# Altium PCB EVT24_REWORK_R167.PcbDoc (part 1 of 2)
Units mil, origin at the board's own origin, x right, y up, seen from the top; angles counter-clockwise.
Board outline 3543.31 x 2755.91 mil, 4 copper layers (Top Layer, Mid-Layer 1, Mid-Layer 2, Bottom Layer), stack 65.748 mil thick; 105 components, 66 nets, 607 pads, 256 vias.
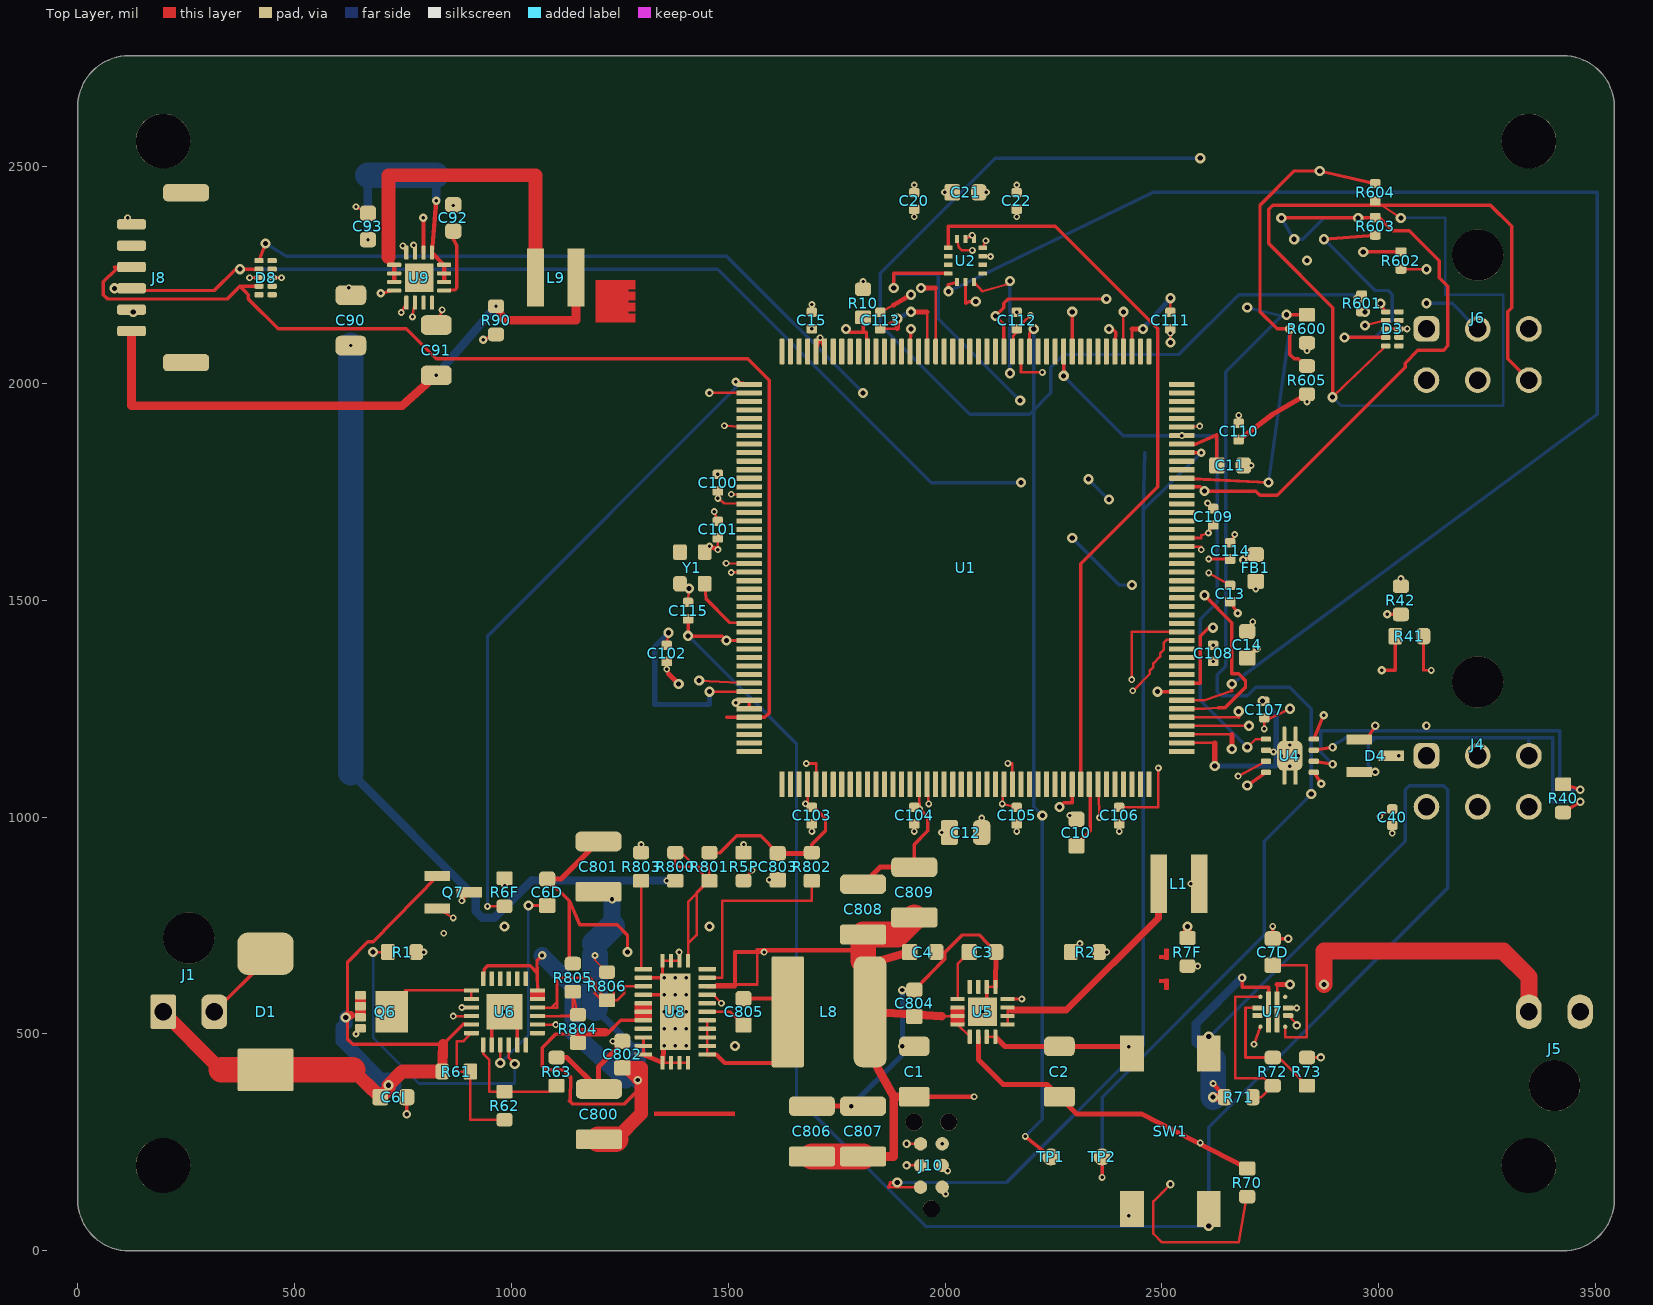
[diagram p0: Top Layer view]
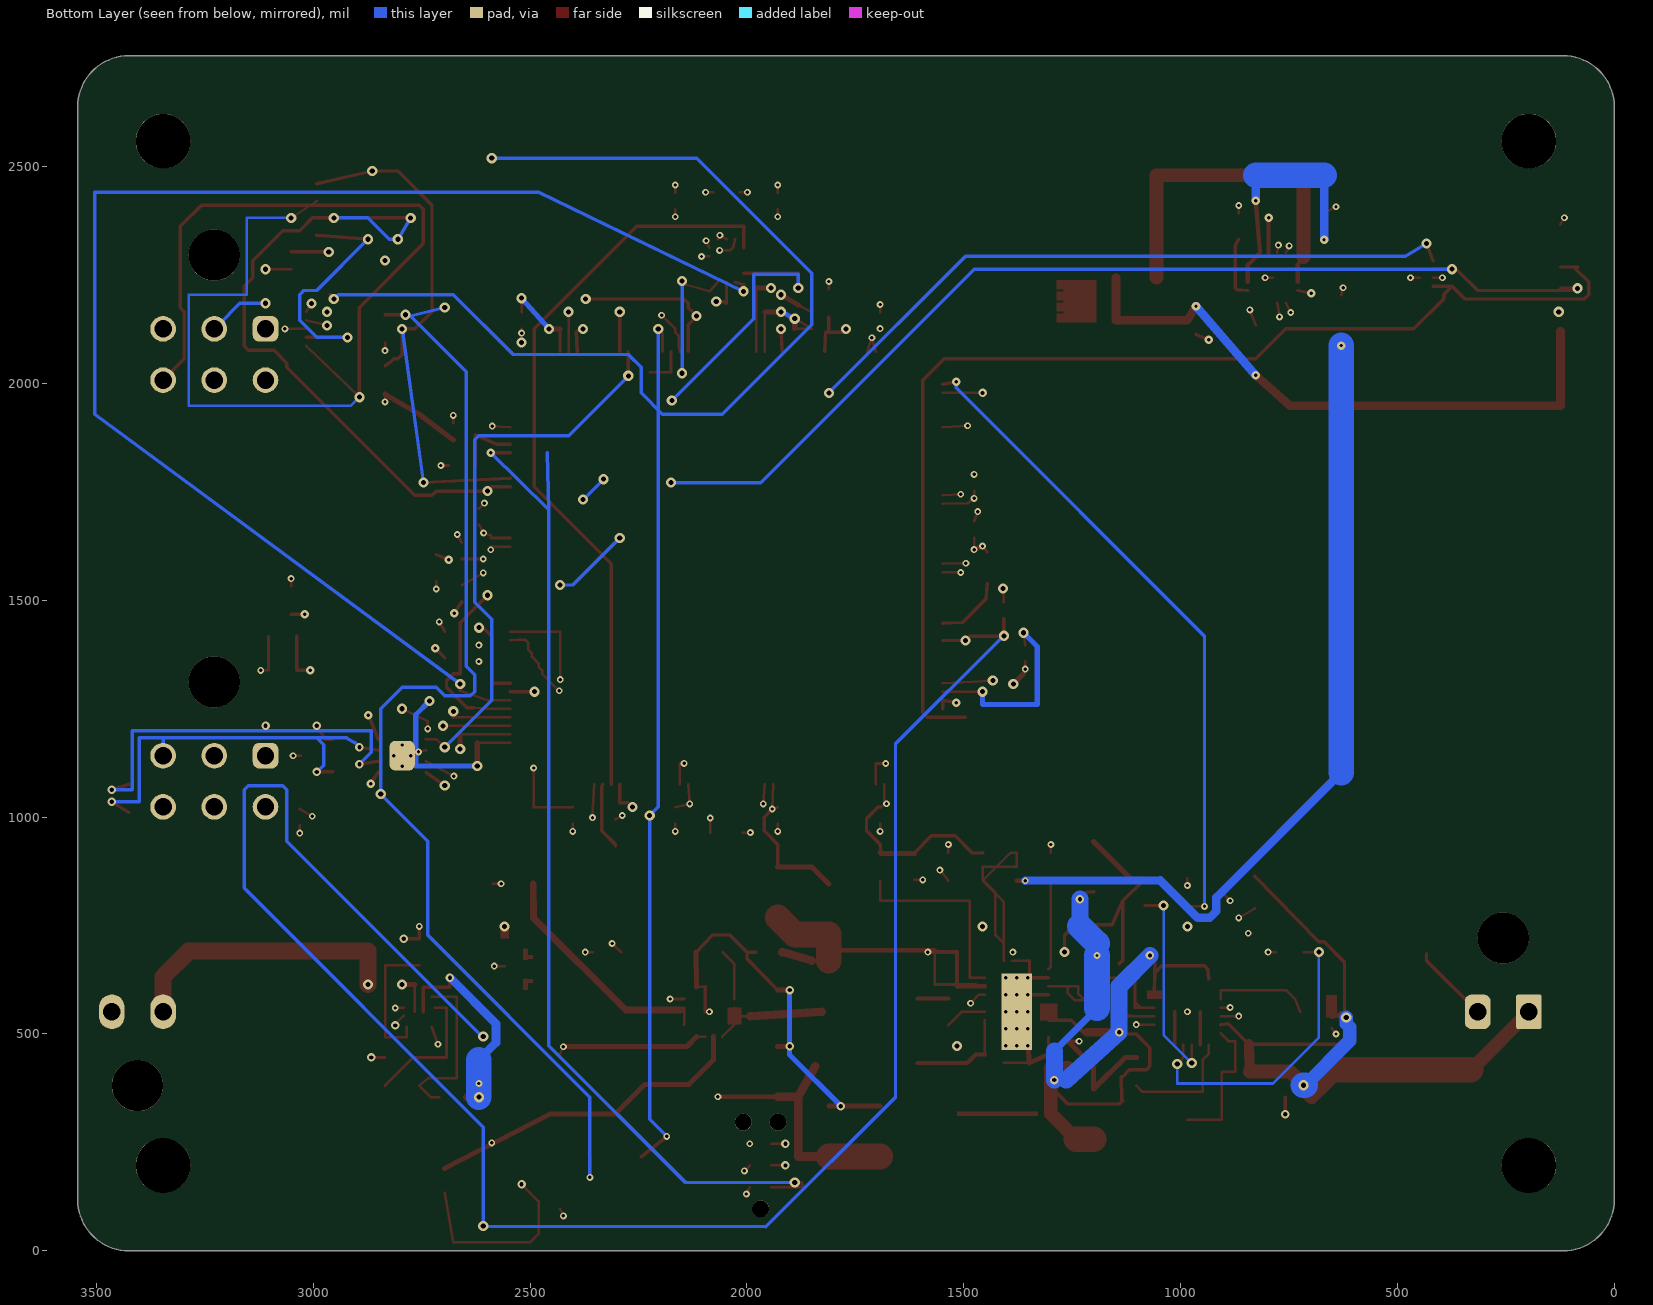
[diagram p1: Bottom Layer view, seen from below]
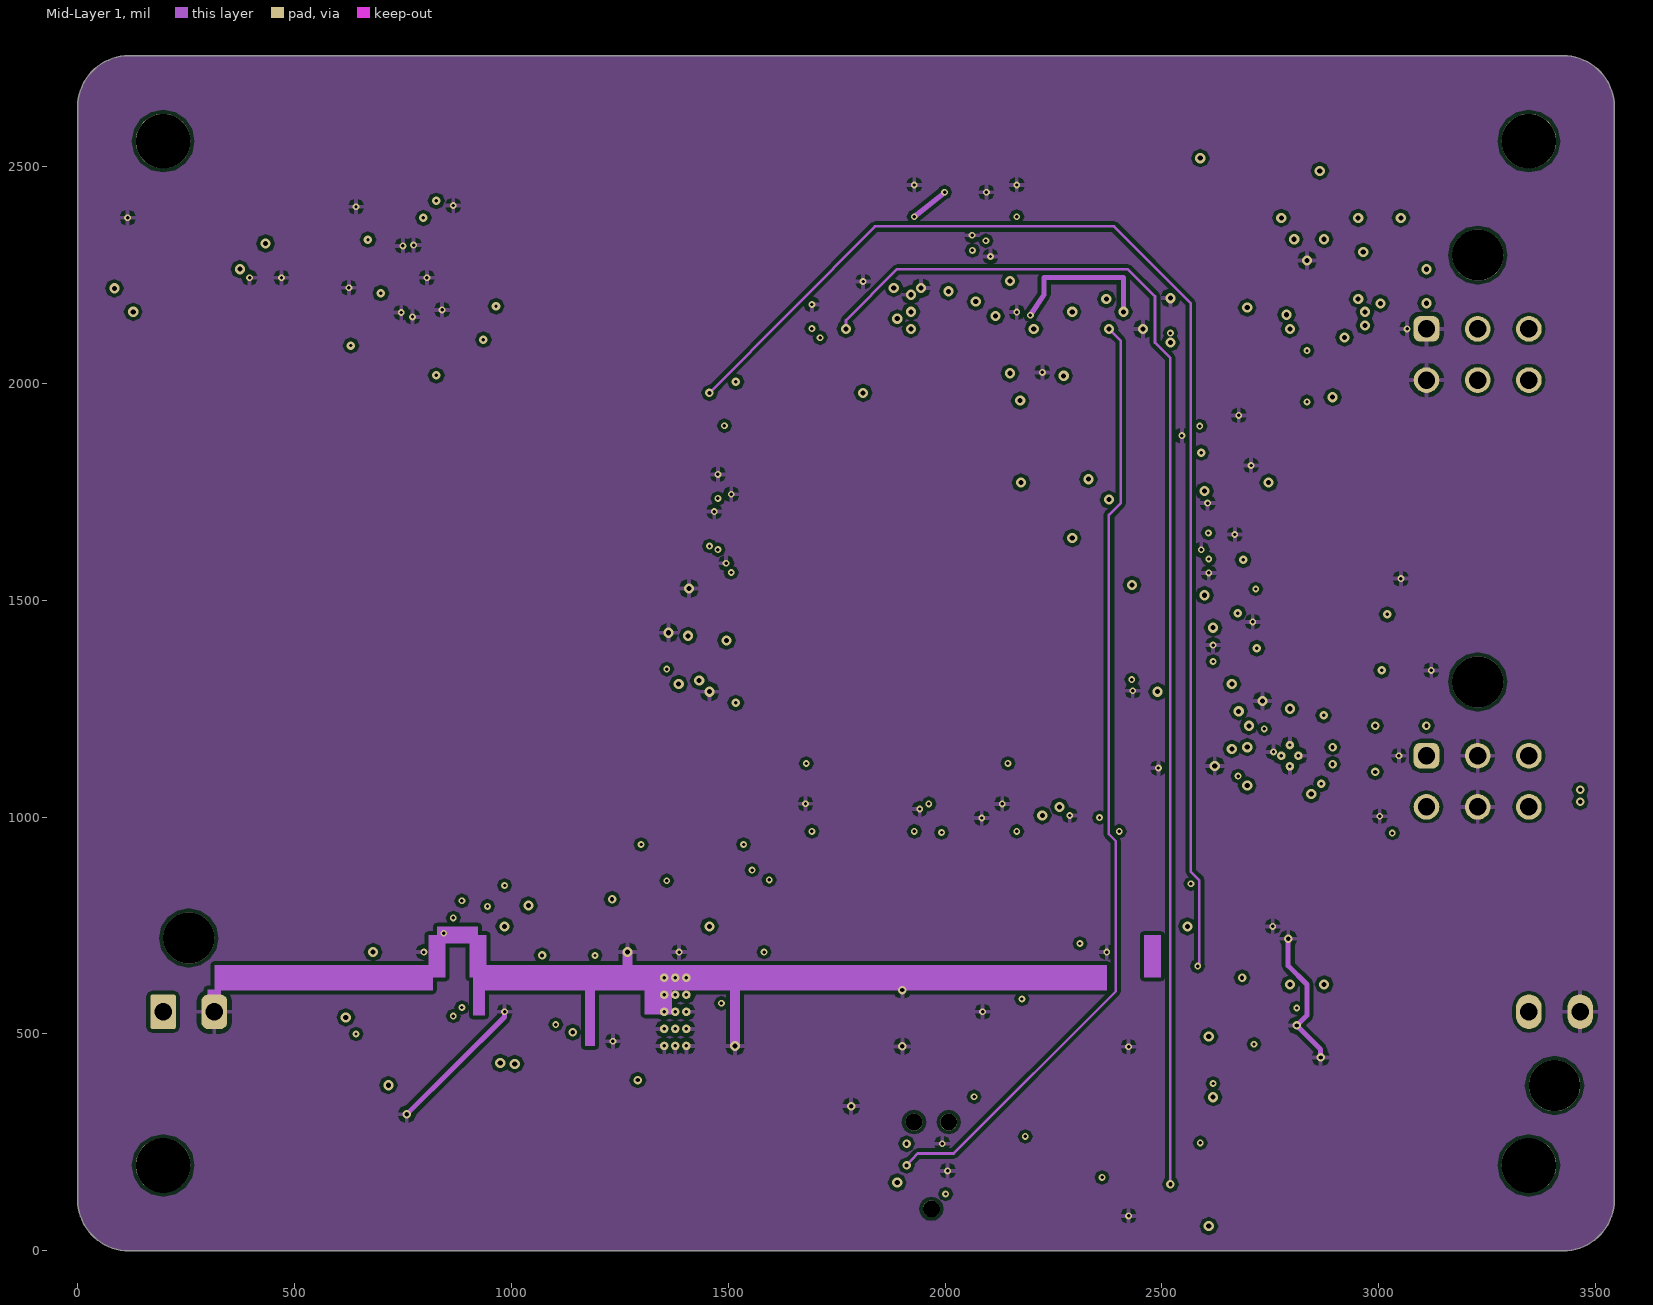
[diagram p2: Mid-Layer 1]
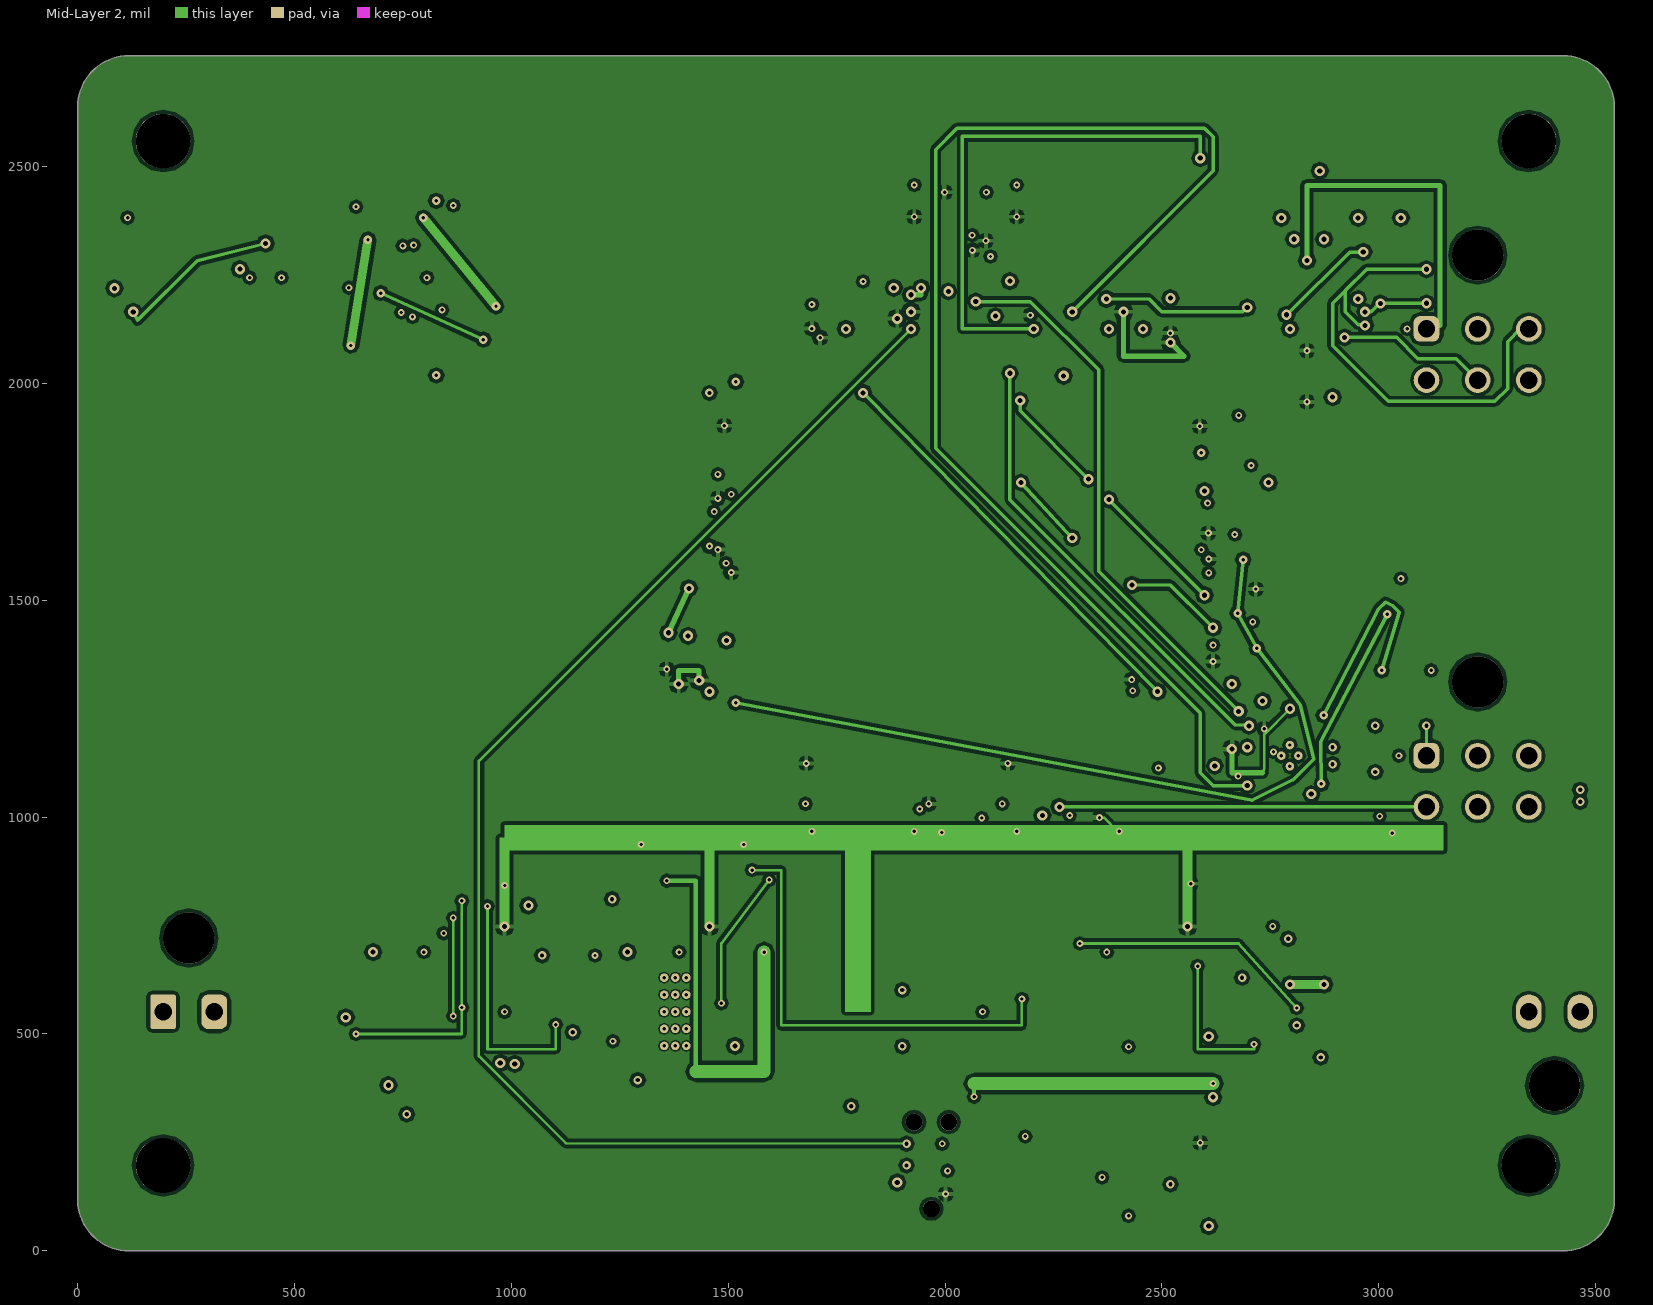
[diagram p3: Mid-Layer 2]

## Layer stack, top to bottom
Top Solder: solder mask 0.4, Solder Resist, Dk 3.5
Top Layer: signal copper 2.7559
Dielectric 2: prepreg 7.0866, PP-006, Dk 4.2
Mid-Layer 1: signal copper 1.378
Dielectric 1: dielectric 43.3071, FR-4, Dk 4.2
Mid-Layer 2: signal copper 1.378
Dielectric 3: prepreg 7.0866, PP-006, Dk 4.2
Bottom Layer: signal copper 2.7559
Bottom Solder: solder mask 0.4, Solder Resist, Dk 3.5

## Board outline
118.11,0 cw(c118.11,118.11) 0,118.11 0,2637.8 cw(c118.11,2637.8) 118.11,2755.91 3425.2,2755.91 cw(c3425.2,2637.8) 3543.31,2637.8 3543.31,118.11 cw(c3425.2,118.11) 3425.2,0

## Design rules (kind name [scope] priority, off if disabled: settings)
AssemblyTestPointUsage [All] p1 off:  // Not a universal-net requirement; EVT fixture testpoint matrix is defined separately
Clearance R_U1_GND_BLIND_VIA_CLEARANCE_REV [IsVia And InNet('GND') vs InComponent('U1')] p1: gap=5.91 ignorepadtopadclearanceinfootprint=FALSE // Mirrored U1 blind via-in-pad clearance rule
Clearance R_U1_GND_BLIND_VIA_CLEARANCE [InComponent('U1') vs IsVia And InNet('GND')] p2: gap=5.91 ignorepadtopadclearanceinfootprint=FALSE // U1 pad 126 blind via-in-pad: 0.4/0.2 mm, local 0.15 mm copper clearance
Clearance R_FINE_PITCH_CLEARANCE_R3_REV [All vs (InComponent('U5') Or InComponent('U6') Or InComponent('U7') Or InComponent('U8') Or InComponent('U9') Or InComponent('Q6') Or InComponent('D8'))] p3: gap=2.95 ignorepadtopadclearanceinfootprint=FALSE // Mirrored 0.075 mm clearance inside verified 0.5 mm-pitch QFN footprints
Clearance R_FINE_PITCH_CLEARANCE_R3 [(InComponent('U5') Or InComponent('U6') Or InComponent('U7') Or InComponent('U8') Or InComponent('U9') Or InComponent('Q6') Or InComponent('D8'))] p4: gap=2.95 ignorepadtopadclearanceinfootprint=TRUE // 0.075 mm local copper clearance inside verified 0.5 mm-pitch QFN footprints
Clearance R_UART_TO_SW_CLEARANCE [InNetClass('NC_HOST_UART') Or InNetClass('NC_GNSS_UART') vs InNet('U8_SW') Or InNet('BUCK_SW') Or InNet('BUCK5_SW')] p5: gap=39.37 ignorepadtopadclearanceinfootprint=FALSE // EVT routing contract
Clearance R_FINE_PITCH_CLEARANCE [(InComponent('U6') Or InComponent('U7') Or InComponent('U8') Or InComponent('Q6') Or InComponent('D8')) vs (InComponent('U6') Or InComponent('U7') Or InComponent('U8') Or InComponent('Q6') Or InComponent('D8'))] p6: gap=5.12 ignorepadtopadclearanceinfootprint=FALSE // Footprint-defined fine-pitch clearance; fabricator confirmation deferred
Clearance R_TIMING_TO_SW_CLEARANCE [InNetClass('NC_TIMING') vs InNet('U8_SW') Or InNet('BUCK_SW') Or InNet('BUCK5_SW')] p7: gap=39.37 ignorepadtopadclearanceinfootprint=FALSE // EVT routing contract
Clearance R_GENERAL_CLEARANCE [All] p8: gap=7.87 ignorepadtopadclearanceinfootprint=TRUE // EVT routing contract
Clearance [All] p9: gap=10 ignorepadtopadclearanceinfootprint=FALSE
ComponentClearance [All] p1: gap=7.87 collisioncheckmode=3 verticalgap=7.87 showdistances=FALSE checkcomponentboundary=TRUE // EVT24 assembly spacing; exact courtyard audit remains mandatory
DiffPairsRouting R_CAN_DIFF [InDifferentialPairClass('DP_CAN')] p1: maxlimit=11.81 minlimit=7.87 mostfreqgap=7.87 toplayer_minwidth=7.87 toplayer_maxwidth=11.81 toplayer_prefwidth=7.87 midlayer1_minwidth=7.87 midlayer1_maxwidth=11.81 midlayer1_prefwidth=7.87 midlayer2_minwidth=7.87 midlayer2_maxwidth=11.81 midlayer2_prefwidth=7.87 bottomlayer_minwidth=7.87 bottomlayer_maxwidth=11.81 bottomlayer_prefwidth=7.87 maxuncoupledlength=500 // EVT routing contract
DiffPairsRouting [All] p2: maxlimit=10 minlimit=10 mostfreqgap=10 toplayer_minwidth=15 toplayer_maxwidth=15 toplayer_prefwidth=15 midlayer1_minwidth=15 midlayer1_maxwidth=15 midlayer1_prefwidth=15 midlayer2_minwidth=15 midlayer2_maxwidth=15 midlayer2_prefwidth=15 bottomlayer_minwidth=15 bottomlayer_maxwidth=15 bottomlayer_prefwidth=15 maxuncoupledlength=500
FabricationTestPointUsage [All] p1 off: valid=0 allowmultiple=FALSE // Not a universal-net requirement; EVT fixture testpoint matrix is defined separately
HoleSize [All] p1: absolutevalues=TRUE maxlimit=129.92 minlimit=7.87 maxpercent=80.000 minpercent=20.000 // EVT24 plated vias and mechanical holes
MinimumSolderMaskSliver [All] p1: minsoldermaskwidth=3.94 // EVT24 minimum solder-mask web, fabrication target 0.10 mm
PolygonConnect [All] p1: connectstyle=Relief reliefconductorwidth=10 reliefentries=4 polygonreliefangle="90 Angle" airgapwidth=10
RoutingVias [All] p1: holewidth=11.81 width=23.62 viastyle="Through Hole" minholewidth=7.87 minwidth=15.75 maxholewidth=11.81 maxwidth=23.62 // EVT24 standard through-via envelope: 0.40/0.20 to 0.60/0.30 mm
SilkToSilkClearance [All] p1: silktosilkclearance=5.91 // EVT24 minimum legend-to-legend clearance
SilkToSolderMaskClearance [IsPad] p1: minsilkscreentomaskgap=5.91 clearancetoexposedcopper=FALSE // EVT24 silkscreen clearance to solder-mask openings
SolderMaskExpansion [All] p1: expansion=0 istentingtop=FALSE
Width R_FINE_PITCH_WIDTH_R4 [(InComponent('U5') Or InComponent('U6') Or InComponent('U7') Or InComponent('U8') Or InComponent('U9') Or InComponent('Q6') Or InComponent('D8'))] p1: maxlimit=5.91 minlimit=3.94 preferedwidth=3.94 // Short local breakout neckdowns for verified 0.5 mm-pitch footprints only
Width R_V12_SYS_WIDTH [InNet('V12_SYS')] p2: maxlimit=118.11 minlimit=5.91 preferedwidth=29.53 // 12 V distribution: 0.15 mm only at pad neckdowns; trunks audited separately
Width R_5V_GNSS_WIDTH [InNet('5V_GNSS')] p3: maxlimit=59.06 minlimit=9.84 preferedwidth=11.81 // External GNSS 5 V supply: 0.25 mm local segment, 0.30 mm preferred
Width R_3V3_TRUNK_WIDTH [InNet('3V3')] p4: maxlimit=78.74 minlimit=5.91 preferedwidth=11.81 // 3.3 V distribution: 0.30 mm preferred, 0.15 mm only at local pad neckdowns
Width R_RADAR_12V_WIDTH [InNet('RADAR_12V')] p5: maxlimit=118.11 minlimit=5.91 preferedwidth=39.37 // Radar 12 V: 0.15 mm only at U7 pin neckdown; 1.0 mm external trunk
Width R_VIN_HIGH_CURRENT [InNet('VIN_RAW') Or InNet('VIN_PROTECTED_24V')] p6: maxlimit=196.85 minlimit=3.94 preferedwidth=59.06 // 24 V net includes controller sense branches; current trunks audited separately
Width R_GNSS_RF_WIDTH [InNet('GNSS_RF')] p7: maxlimit=14.17 minlimit=14.17 preferedwidth=14.17
Width R_GENERAL_WIDTH [All] p8: maxlimit=39.37 minlimit=5.91 preferedwidth=7.87 // General signals: 0.15 mm minimum; wider local copper permitted
22 further rules are at their usual default settings.

## Classes and differential pairs
net class NC_IMU_SPI: IMU_MISO IMU_MOSI IMU_NSS IMU_SCK
net class NC_GNSS_UART: GNSS_RX_EXT GNSS_TX_EXT
net class NC_HOST_UART: HOST_UART1_RX HOST_UART1_RX_EXT HOST_UART1_TX HOST_UART1_TX_EXT HOST_UART2_RX HOST_UART2_RX_EXT HOST_UART2_TX HOST_UART2_TX_EXT
net class NC_TIMING: GNSS_PPS IMU_DRDY RADAR_REF
net class NC_CAN: RADAR_CANH RADAR_CANL
net class NC_POWER_5V_GNSS: 5V_GNSS
net class NC_POWER_3V3: 3V3 VDDA_FILTERED
net class NC_POWER_12V: RADAR_12V V12_SYS
net class NC_POWER_24V: VIN_PROTECTED_24V VIN_RAW
differential pair class DP_CAN: DP_CAN
component class TIME_GNSS: D8 J8
component class DEBUG_BOOT: R70 SW1
component class HOST_UART: D3 J6 R600 R601 R602 R603 R604 R605
component class RADAR_IO_CAN: C40 D4 J4 J5 R40 R41 R42 U4
component class IMU: C20 C21 C22 U2
component class MCU_CORE: C10 C11 C12 C13 C14 C15 C100 C101 C102 C103 C104 C105 C106 C107 C108 C109 C110 C111 C112 C113 C114 C115 FB1 J10 R10 TP1 TP2 U1 Y1
component class POWER_INPUT: C1 C2 C3 C4 C6D C6I C7D C90 C91 C92 C93 C800 C801 C802 C803 C804 C805 C806 C807 C808 C809 D1 J1 L1 L8 L9 Q6 Q7 R1 R2 R5P R6F R7F R61 R62 R63 R71 R72 R73 R90 R800 R801 R802 R803 R804 R805 R806 U5 U6 U7 U8 U9
differential pair DP_CAN: +RADAR_CANH -RADAR_CANL

## Components (designator, comment, footprint, x,y, rotation, side; value= is the part's Value field where it differs from the comment)
C1 "10uF/25V" C_1206_3216Metric#1 1929.13,413.39 r90 top
C2 "22uF/6.3V" C_1206_3216Metric#1 2263.78,413.39 r90 top
C3 "3.3nF" C_0603_1608Metric#1 2086.61,688.98 r0 top
C4 "100nF/25V" C_0603_1608Metric#1 1948.82,688.98 r0 top
C6D "100nF" C_0603_1608Metric#1 1082.68,826.77 r90 top
C6I "100nF/100V" C_0603_1608Metric#1 728.35,354.33 r0 top
C7D "3.3nF" C_0603_1608Metric#1 2755.91,688.98 r90 top
C10 "2.2uF" C_0603_1608Metric#1 2303.15,964.57 r90 top
C11 "2.2uF" C_0603_1608Metric#1 2657.48,1811.02 r0 top
C12 "4.7uF" C_0805_2012Metric 2047.24,964.57 r0 top
C13 "100nF" C_0402_1005Metric#1 2657.48,1515.75 r90 top
C14 "1uF" C_0603_1608Metric#1 2696.85,1397.64 r90 top
C15 "100nF" C_0402_1005Metric#1 1692.91,2145.67 r90 top
C20 "100nF" C_0402_1005Metric#1 1929.13,2421.26 r90 top
C21 "2.2uF" C_0603_1608Metric#1 2047.24,2440.94 r0 top
C22 "10nF" C_0402_1005Metric#1 2165.35,2421.26 r90 top
C40 "100nF" C_0402_1005Metric#2 3031.5,1000 r180 top
C90 "10uF/25V" C_1206_3216Metric#2 629.92,2145.67 r0 top
C91 "22uF/10V" C_1206_3216Metric#3 800,1881.1 r0 top
C92 "3.3nF" C_0603_1608Metric#2 866.14,2381.89 r0 top
C93 "100nF/25V" C_0603_1608Metric#2 669.29,2362.2 r0 top
C100 "100nF VDD" C_0402_1005Metric#1 1476.38,1771.65 r90 top
C101 "100nF VDD" C_0402_1005Metric#3 1476.38,1663.39 r90 top
C102 "100nF VDD" C_0402_1005Metric#1 1358.27,1377.95 r90 top
C103 "100nF VDD" C_0402_1005Metric#1 1692.91,1003.94 r90 top
C104 "100nF VDD" C_0402_1005Metric#1 1929.13,1003.94 r90 top
C105 "100nF VDD" C_0402_1005Metric#1 2165.35,1003.94 r90 top
C106 "100nF VDD" C_0402_1005Metric#1 2401.57,1003.94 r90 top
C107 "100nF VDD" C_0402_1005Metric#2 2736.22,1248.03 r180 top
C108 "100nF VDD" C_0402_1005Metric#1 2618.11,1377.95 r90 top
C109 "100nF VDD" C_0402_1005Metric#1 2618.11,1692.91 r90 top
C110 "100nF VDD" C_0402_1005Metric#1 2677.17,1889.76 r90 top
C111 "100nF VDD" C_0402_1005Metric#1 2519.69,2145.67 r90 top
C112 "100nF VDD" C_0402_1005Metric#1 2165.35,2145.67 r90 top
C113 "100nF VDD" C_0402_1005Metric#1 1850.39,2145.67 r90 top
C114 "100nF VDD33_USB" C_0402_1005Metric#1 2657.48,1614.17 r90 top
C115 "100nF NRST" C_0402_1005Metric#1 1407.48,1476.38 r90 top
C800 "4.7uF/100V" C_1210_3225Metric 1201.79,314.96 r90 top
C801 "4.7uF/100V" C_1210_3225Metric 1200.79,885.83 r90 top
C802 "47nF/100V" C_0603_1608Metric#1 1255.9,452.76 r90 top
C803 "2.2uF/10V" C_0603_1608Metric#1 1614.17,885.83 r90 top
C804 "1uF/25V" C_0603_1608Metric#1 1929.13,570.87 r90 top
C805 "470nF/25V" C_0603_1608Metric#1 1535.43,551.18 r90 top
C806 "47uF/25V" C_1210_3225Metric 1692.91,275.59 r90 top
C807 "47uF/25V" C_1210_3225Metric 1811.02,275.59 r90 top
C808 "47uF/25V" C_1210_3225Metric 1811.02,787.4 r90 top
C809 "47uF/25V" C_1210_3225Metric 1929.13,826.77 r90 top
D1 "SMCJ36CA" D_SMC 433.07,551.18 r90 top
D3 "DUAL_UART_ESD" USON-10_2.5x1.0mm_P0.5mm 3031.5,2125.98 r0 top
D4 "CAN_ESD" SOT-23 2992.13,1141.73 r0 top
D8 "UART_PPS_ESD" USON-10_2.5x1.0mm_P0.5mm 433.07,2244.09 r0 top
FB1 "BLM18BD601SH1" L_0603_1608Metric 2716.54,1574.8 r90 top
J1 "24V_IN" Molex_43650-0200_RA_THT_2P#1 196.85,551.18 r0 top
J4 "RADAR_IO" Molex_43045-0600_RA_THT_6P 3110.24,1141.73 r0 top
J5 "RADAR_PWR" Molex_43650-0200_RA_THT_2P#2 3346.46,551.18 r0 top
J6 "HOST_UART_2X" Molex_43045-0600_RA_THT_6P 3110.24,2125.98 r0 top
J8 "EXT_GNSS_PIXHAWK" JST_GH_SM06B-GHS-TB_1x06-1MP_P1.25mm_Horizontal 196.85,2244.09 r0 top
J10 "TC2030_SWD" TagConnect_TC2030_NL 1968.5,196.85 r90 top
L1 "2.2uH" Coilcraft_XFL4020_4x4 2539.37,846.46 r0 top
L8 "10uH XAL7070-103MEC" L_Coilcraft_XAL7070-XXX 1732.28,551.18 r0 top
L9 "2.2uH" Coilcraft_XFL4020_4x4 1102.36,2244.09 r0 top
Q6 "CSD19537Q3" VSON-8_3.3x3.3mm_P0.65mm_NexFET 708.66,551.18 r0 top
Q7 "BSS138" SOT-23 866.14,826.77 r0 top
R1 "4.02k 1%" R_0603_1608Metric#1 748.03,688.98 r0 top
R2 "1.05k 1%" R_0603_1608Metric#1 2322.83,688.98 r0 top
R5P "100k 1% PG_PU" R_0603_1608Metric#2 1535.43,885.83 r90 top
R6F "10k 1% FLT_PU" R_0603_1608Metric#2 984.25,826.77 r90 top
R7F "10k 1% FLT_PU" R_0603_1608Metric#2 2559.06,688.98 r90 top
R10 "10k 1%" R_0603_1608Metric#1 1811.02,2185.04 r90 top
R40 "120R" R_0603_1608Metric#2 3425.2,1043.31 r90 top
R41 "10k" R_0603_1608Metric#3 3070.87,1417.32 r0 top
R42 "10k" R_0603_1608Metric#4 3051.18,1500 r0 top
R61 "887k 1%" R_0603_1608Metric#2 873.03,413.39 r0 top
R62 "29.4k 1%" R_0603_1608Metric#2 984.25,334.65 r90 top
R63 "34.0k 1%" R_0603_1608Metric#1 1104.33,413.39 r90 top
R70 "0R" R_0603_1608Metric#3 2696.85,157.48 r90 top
R71 "470k 1%" R_0603_1608Metric#3 2677.17,354.33 r0 top
R72 "16.9k 1%" R_0603_1608Metric#5 2755.91,413.39 r90 top
R73 "43.7k 1%" R_0603_1608Metric#1 2834.65,413.39 r90 top
R90 "100k 1% PG_PU" R_0603_1608Metric#4 964.57,2145.67 r0 top
R600 "10k" R_0603_1608Metric#2 2834.65,2125.98 r90 top
R601 "33R" R_0402_1005Metric#1 2960.63,2185.04 r90 top
R602 "33R" R_0402_1005Metric#2 3051.18,2283.47 r90 top
R603 "33R" R_0402_1005Metric#2 2992.13,2362.2 r90 top
R604 "33R" R_0402_1005Metric#3 2992.13,2440.94 r90 top
R605 "10k" R_0603_1608Metric#4 2834.65,2007.87 r0 top
R800 "100k 1%" R_0603_1608Metric#1 1377.95,885.83 r90 top
R801 "9.09k 1%" R_0603_1608Metric#1 1456.69,885.83 r90 top
R802 "100k 1% RT" R_0603_1608Metric#1 1692.91,885.83 r90 top
R803 "100k 1% PG_PU" R_0603_1608Metric#1 1299.21,885.83 r90 top
R804 "499k 1%" R_0603_1608Metric#1 1153.54,511.81 r90 top
R805 "56.0k 1%" R_0603_1608Metric#1 1141.73,629.92 r90 top
R806 "100k 1%" R_0603_1608Metric#1 1220.47,610.24 r90 top
SW1 "NRST" ESwitch_TL3301_GullWing_6x6 2519.68,275.59 r0 top
TP1 "HOST_UART1_TX" TestPoint_Pad_D1.0mm 2244.09,216.54 r0 top
TP2 "HOST_UART1_RX" TestPoint_Pad_D1.0mm 2362.2,216.54 r0 top
U1 "STM32H753IIT6" LQFP-176_24x24mm_P0.5mm 2047.24,1574.8 r0 top
U2 "IMU" ICM-42688-P_LGA14_2.5x3mm_P0.5mm 2047.24,2283.46 r0 top
U4 "CAN_FD" Texas_DRB0008A 2795.28,1141.73 r0 top
U5 "3V3_BUCK" VQFN-16-1EP_3x3mm_P0.5mm_EP1.68x1.68mm#1 2086.61,551.18 r180 top
U6 "24V_SYS_EFUSE" Texas_RGE0024C_VQFN-24-1EP_4x4mm_P0.5mm_EP2.1x2.1mm 984.25,551.18 r0 top
U7 "RADAR_12V_EFUSE" TPS259470A_RPW0010A_VQFN-HR-10_2x2mm_P0.475mm 2755.91,551.18 r0 top
U8 "24V_TO_12V_5A" Texas_RNP0030B_WQFN-30-1EP_4x6mm_P0.5mm_EP1.8x4.5mm_ThermalVias 1377.95,551.18 r180 top
U9 "5V_GNSS_BUCK" VQFN-16-1EP_3x3mm_P0.5mm_EP1.68x1.68mm#2 787.4,2244.09 r0 top
Y1 "25MHz_OSC" Oscillator_SMD_ECS_2520MV-xxx-xx-4Pin_2.5x2.0mm 1417.32,1574.8 r0 top

## Footprints (in the part's own frame and the unit in brackets; to place one, negate y for a bottom-side part, rotate by r counter-clockwise, add the part's x,y. Pads: shape width x height; smd on the part's side, far side on the other; paste and mask are expansions set on the pad)
C_0402_1005Metric#1 [mm]
  rrect25% 0.56x0.62 smd: 1(-0.48,0)
  rrect50% 0.56x0.62 smd: 2(0.48,0)
C_0402_1005Metric#2 [mm]
  rrect50% 0.62x0.56 smd: 1(0,0.48) 2(0,-0.48)
C_0402_1005Metric#3 [mm]
C_0603_1608Metric#1 [mm]
  rrect25% 0.9x0.95 smd: 1(-0.775,0)
  rrect50% 0.9x0.95 smd: 2(0.775,0)
C_0603_1608Metric#2 [mm]
  rrect50% 0.95x0.9 smd: 1(0,-0.775) 2(0,0.775)
C_0805_2012Metric [mm]
  rrect25% 1x1.45 smd: 1(-0.95,0)
  rrect50% 1x1.45 smd: 2(0.95,0)
C_1206_3216Metric#1 [mm]
  rrect22% 1.15x1.8 smd: 1(-1.475,0)
  rrect50% 1.15x1.8 smd: 2(1.475,0)
C_1206_3216Metric#2 [mm]
  rrect50% 1.8x1.15 smd: 1(0,-1.475) 2(0,1.475)
C_1206_3216Metric#3 [mm]
  rrect50% 1.8x1.15 smd: 1(0.68,3.495) 2(0.68,6.445)
C_1210_3225Metric [mm]
  rrect22% 1.15x2.7 smd mask+0: 1(-1.475,0)
  rrect50% 1.15x2.7 smd mask+0: 2(1.475,0)
Coilcraft_XFL4020_4x4 [mm]
  rect 0.98x3.4 smd: 1(-1.185,0) 2(1.185,0)
D_SMC [mm]
  rrect10% 2.5x3.3 smd mask+0: 1(-3.4,0)
  rrect50% 2.5x3.3 smd mask+0: 2(3.4,0)
ESwitch_TL3301_GullWing_6x6 [mm] "E-Switch TL3301 series, 6 x 6 mm gull-wing tactile switch"
  rect 1.4x2.1 smd: 1(2.25,-4.55) 1(2.25,4.55) 2(-2.25,-4.55) 2(-2.25,4.55)
ICM-42688-P_LGA14_2.5x3mm_P0.5mm [mm]
  rect 0.475x0.25 smd: 1(-1.012,-0.75) 2(-1.012,-0.25) 3(-1.012,0.25) 4(-1.012,0.75) 8(1.012,0.75) 9(1.012,0.25) 10(1.012,-0.25) 11(1.012,-0.75)
  rect 0.25x0.475 smd: 5(-0.5,1.262) 6(0,1.262) 7(0.5,1.262) 12(0.5,-1.262) 13(0,-1.262) 14(-0.5,-1.262)
JST_GH_SM06B-GHS-TB_1x06-1MP_P1.25mm_Horizontal [mm]
  rrect50% 1.7x0.6 smd: 1(-1.85,-3.125) 2(-1.85,-1.875) 3(-1.85,-0.625) 4(-1.85,0.625) 5(-1.85,1.875) 6(-1.85,3.125)
  rrect50% 2.7x1 smd: MP(1.35,-4.975) MP(1.35,4.975)
L_0603_1608Metric [mm]
  rrect25% 0.875x0.95 smd: 1(-0.787,0)
  rrect50% 0.875x0.95 smd: 2(0.787,0)
L_Coilcraft_XAL7070-XXX [mm]
  rrect13% 1.92x6.5 smd mask+0: 1(-2.41,0)
  rrect50% 1.92x6.5 smd mask+0: 2(2.41,0)
LQFP-176_24x24mm_P0.5mm [mm]
  rrect25% 1.5x0.3 smd: 1(-12.675,10.75) 2(-12.675,10.25) 3(-12.675,9.75) 4(-12.675,9.25) 5(-12.675,8.75) 6(-12.675,8.25) 7(-12.675,7.75) 8(-12.675,7.25) 9(-12.675,6.75) 10(-12.675,6.25) 11(-12.675,5.75) 12(-12.675,5.25) 13(-12.675,4.75) 14(-12.675,4.25) 15(-12.675,3.75) 16(-12.675,3.25) 17(-12.675,2.75) 18(-12.675,2.25) 19(-12.675,1.75) 20(-12.675,1.25) 21(-12.675,0.75) 22(-12.675,0.25) 23(-12.675,-0.25) 24(-12.675,-0.75) 25(-12.675,-1.25) 26(-12.675,-1.75) 27(-12.675,-2.25) 28(-12.675,-2.75) 29(-12.675,-3.25) 30(-12.675,-3.75) 31(-12.675,-4.25) 32(-12.675,-4.75) 33(-12.675,-5.25) 34(-12.675,-5.75) 35(-12.675,-6.25) 36(-12.675,-6.75) 37(-12.675,-7.25) 38(-12.675,-7.75) 39(-12.675,-8.25) 40(-12.675,-8.75) 41(-12.675,-9.25) 42(-12.675,-9.75) 43(-12.675,-10.25) 44(-12.675,-10.75) 89(12.675,-10.75) 90(12.675,-10.25) 91(12.675,-9.75) 92(12.675,-9.25) 93(12.675,-8.75) 94(12.675,-8.25) 95(12.675,-7.75) 96(12.675,-7.25) 97(12.675,-6.75) 98(12.675,-6.25) 99(12.675,-5.75) 100(12.675,-5.25) 101(12.675,-4.75) 102(12.675,-4.25) 103(12.675,-3.75) 104(12.675,-3.25) 105(12.675,-2.75) 106(12.675,-2.25) 107(12.675,-1.75) 108(12.675,-1.25) 109(12.675,-0.75) 110(12.675,-0.25) 111(12.675,0.25) 112(12.675,0.75) 113(12.675,1.25) 114(12.675,1.75) 115(12.675,2.25) 116(12.675,2.75) 117(12.675,3.25) 118(12.675,3.75) 119(12.675,4.25) 120(12.675,4.75) 121(12.675,5.25) 122(12.675,5.75) 123(12.675,6.25) 124(12.675,6.75) 125(12.675,7.25) 126(12.675,7.75) 127(12.675,8.25) 128(12.675,8.75) 129(12.675,9.25) 130(12.675,9.75) 131(12.675,10.25) 132(12.675,10.75)
  rrect25% 0.3x1.5 smd: 45(-10.75,-12.675) 46(-10.25,-12.675) 47(-9.75,-12.675) 48(-9.25,-12.675) 49(-8.75,-12.675) 50(-8.25,-12.675) 51(-7.75,-12.675) 52(-7.25,-12.675) 53(-6.75,-12.675) 54(-6.25,-12.675) 55(-5.75,-12.675) 56(-5.25,-12.675) 57(-4.75,-12.675) 58(-4.25,-12.675) 59(-3.75,-12.675) 60(-3.25,-12.675) 61(-2.75,-12.675) 62(-2.25,-12.675) 63(-1.75,-12.675) 64(-1.25,-12.675) 65(-0.75,-12.675) 66(-0.25,-12.675) 67(0.25,-12.675) 68(0.75,-12.675) 69(1.25,-12.675) 70(1.75,-12.675) 71(2.25,-12.675) 72(2.75,-12.675) 73(3.25,-12.675) 74(3.75,-12.675) 75(4.25,-12.675) 76(4.75,-12.675) 77(5.25,-12.675) 78(5.75,-12.675) 79(6.25,-12.675) 80(6.75,-12.675) 81(7.25,-12.675) 82(7.75,-12.675) 83(8.25,-12.675) 84(8.75,-12.675) 85(9.25,-12.675) 86(9.75,-12.675) 87(10.25,-12.675) 88(10.75,-12.675) 133(10.75,12.675) 134(10.25,12.675) 135(9.75,12.675) 136(9.25,12.675) 137(8.75,12.675) 138(8.25,12.675) 139(7.75,12.675) 140(7.25,12.675) 141(6.75,12.675) 142(6.25,12.675) 143(5.75,12.675) 144(5.25,12.675) 145(4.75,12.675) 146(4.25,12.675) 147(3.75,12.675) 148(3.25,12.675) 149(2.75,12.675) 150(2.25,12.675) 151(1.75,12.675) 152(1.25,12.675) 153(0.75,12.675) 154(0.25,12.675) 155(-0.25,12.675) 156(-0.75,12.675) 157(-1.25,12.675) 159(-2.25,12.675) 160(-2.75,12.675) 161(-3.25,12.675) 162(-3.75,12.675) 163(-4.25,12.675) 164(-4.75,12.675) 165(-5.25,12.675) 166(-5.75,12.675) 167(-6.25,12.675) 168(-6.75,12.675) 169(-7.25,12.675) 170(-7.75,12.675) 171(-8.25,12.675) 172(-8.75,12.675) 173(-9.25,12.675) 174(-9.75,12.675) 175(-10.25,12.675) 176(-10.75,12.675)
  rrect50% 0.3x1.5 smd: 158(-1.75,12.675)
Molex_43045-0600_RA_THT_6P [mm]
  rrect50% 1.5x1.5 hole 1.02: 1(0,0)
  round 1.5 hole 1.02: 2(3,0) 3(6,0) 4(0,-3) 5(3,-3) 6(6,-3)
  round 3 hole 3: Un1(3,4.32)
Molex_43650-0200_RA_THT_2P#1 [mm]
  rrect17% 1.5x2.02 hole 1.02: 1(0,0)
  rrect50% 1.5x2.02 hole 1.02: 2(3,0)
  round 3 hole 3: Un1(1.5,4.32)
Molex_43650-0200_RA_THT_2P#2 [mm] "Molex Micro-Fit 3.0 43650-0200, 2-position right-angle THT"
  oval 1.5x2.02 hole 1.02: 1(0,0) 2(3,0)
  round 3 hole 3 unplated: ""(1.5,-4.32)
Oscillator_SMD_ECS_2520MV-xxx-xx-4Pin_2.5x2.0mm [mm]
  rrect25% 0.8x0.9 smd: 1(-0.725,0.925) 3(0.725,-0.925) 4(0.725,0.925)
  rrect50% 0.8x0.9 smd: 2(-0.725,-0.925)
R_0402_1005Metric#1 [mil]
R_0402_1005Metric#2 [mil]
  rrect50% 21.26x25.2 smd: 1(-20.08,0)
  rrect25% 21.26x25.2 smd: 2(20.08,0)
R_0402_1005Metric#3 [mil]
  rrect25% 21.26x25.2 smd: 1(-20.08,0)
  rrect50% 21.26x25.2 smd: 2(20.08,0)
R_0603_1608Metric#1 [mm]
  rrect25% 0.8x0.95 smd: 1(-0.825,0)
  rrect50% 0.8x0.95 smd: 2(0.825,0)
R_0603_1608Metric#2 [mm]
  rrect50% 0.8x0.95 smd: 1(-0.825,0)
  rrect25% 0.8x0.95 smd: 2(0.825,0)
R_0603_1608Metric#3 [mm]
R_0603_1608Metric#4 [mm]
  rrect50% 0.95x0.8 smd: 1(0,-0.825) 2(0,0.825)
R_0603_1608Metric#5 [mm]
  rrect50% 0.8x0.95 smd: 1(-0.825,0) 2(0.825,0)
SOT-23 [mm] "JEDEC TO-236 AB, three-pad SOT-23"
  rect 1.475x0.6 smd: 1(-0.937,-0.95) 2(-0.937,0.95) 3(0.937,0)
TagConnect_TC2030_NL [mil]
  round 31 smd: 1(-50,-25) 2(-50,25) 3(0,-25) 4(0,25) 5(50,-25) 6(50,25)
  round 39 hole 39: Un1(-100,0) Un2(100,40) Un3(100,-40)
TestPoint_Pad_D1.0mm [mm]
  round 1 smd: 1(0,0)
Texas_DRB0008A [mm]
  rrect50% 0.6x0.31 smd: 1(-1.4,0.975) 2(-1.4,0.325) 3(-1.4,-0.325) 4(-1.4,-0.975) 5(1.4,-0.975) 6(1.4,-0.325) 7(1.4,0.325) 8(1.4,0.975)
  round 0.5 hole 0.2: 9(-0.5,0) 9(0,-0.625) 9(0,0.625) 9(0.5,0)
  rrect50% 0.23x1.025 smd: 9(-0.325,-1.188) 9(-0.325,1.188) 9(0.325,-1.188) 9(0.325,1.188)
  rrect50% 1.5x1.75 smd: 9(0,0)
  rrect50% 1.5x1.75 smd far side: 9(0,0)
  rrect50% 0.23x0.725 on Top Paste: Un1(-0.325,1.337) Un2(-0.325,-1.337) Un4(0.325,1.337) Un5(0.325,-1.337)
  rrect50% 1.34x1.55 on Top Paste: Un3(0,0)
Texas_RGE0024C_VQFN-24-1EP_4x4mm_P0.5mm_EP2.1x2.1mm [mm]
  rrect25% 0.875x0.25 smd mask+0: 1(-1.937,1.25) 2(-1.937,0.75) 3(-1.937,0.25) 4(-1.937,-0.25) 5(-1.937,-0.75) 6(-1.937,-1.25) 13(1.937,-1.25) 14(1.937,-0.75) 15(1.937,-0.25) 16(1.937,0.25) 17(1.937,0.75) 18(1.937,1.25)
  rrect25% 0.25x0.875 smd mask+0: 7(-1.25,-1.937) 8(-0.75,-1.937) 9(-0.25,-1.937) 10(0.25,-1.937) 11(0.75,-1.937) 12(1.25,-1.937) 19(1.25,1.937) 20(0.75,1.937) 21(0.25,1.937) 22(-0.25,1.937) 23(-0.75,1.937) 24(-1.25,1.937)
  rect 2.1x2.1 smd paste-2.1 mask+0: 25(0,0)
  rrect50% 0.85x0.85 on Top Paste mask-0.85: Un1(-0.525,0.525) Un2(-0.525,-0.525) Un3(0.525,0.525) Un4(0.525,-0.525)
Texas_RNP0030B_WQFN-30-1EP_4x6mm_P0.5mm_EP1.8x4.5mm_ThermalVias [mm]
  rrect25% 1.025x0.25 smd mask+0: 1(-1.863,2.5) 2(-1.863,2) 3(-1.863,1.5) 4(-1.863,1) 5(-1.863,0.5) 6(-1.863,0) 7(-1.863,-0.5) 8(-1.863,-1) 9(-1.863,-1.5) 10(-1.863,-2) 11(-1.863,-2.5) 16(1.863,-2.5) 17(1.863,-2) 18(1.863,-1.5) 19(1.863,-1) 20(1.863,-0.5) 21(1.863,0) 22(1.863,0.5) 23(1.863,1) 24(1.863,1.5) 25(1.863,2) 26(1.863,2.5)
  rrect25% 0.25x0.775 smd mask+0: 12(-0.75,-2.987) 13(-0.25,-2.987) 14(0.25,-2.987) 15(0.75,-2.987) 27(0.75,2.987) 28(0.25,2.987) 29(-0.25,2.987) 30(-0.75,2.987)
  round 0.5 hole 0.2 paste-2539.97 mask-0.5: 31(-0.65,2) 31(-0.65,1) 31(-0.65,0) 31(-0.65,-1) 31(-0.65,-2) 31(0,2) 31(0,1) 31(0,0) 31(0,-1) 31(0,-2) 31(0.65,2) 31(0.65,1) 31(0.65,0) 31(0.65,-1) 31(0.65,-2)
  rect 1.8x4.5 smd paste-4.5 mask+0: 31(0,0)
  rect 1.8x4.5 smd far side paste-4.5 mask-4.5: 31(0,0)
  rrect50% 0.78x0.97 on Top Paste mask-0.97: Un1(-0.45,1.68) Un2(-0.45,0.56) Un3(-0.45,-0.56) Un4(-0.45,-1.68) Un5(0.45,1.68) Un6(0.45,0.56) Un7(0.45,-0.56) Un8(0.45,-1.68)
TPS259470A_RPW0010A_VQFN-HR-10_2x2mm_P0.475mm [mm]
  round 0.25 smd: 1(-0.725,0.875) 4(-0.725,-0.875) 7(0.725,-0.875) 10(0.725,0.875)
  rrect17% 0.6x0.3 smd: 2(-0.9,0.225) 3(-0.9,-0.225) 9(0.9,0.225)
  rrect17% 0.3x2.4 smd: 5(-0.25,0) 6(0.25,0)
  rrect50% 0.6x0.3 smd: 8(0.9,-0.225)
  rrect17% 0.3x1.05 on Top Paste: Un1(-0.25,0.675) Un2(-0.25,-0.675) Un3(0.25,0.675) Un4(0.25,-0.675)
USON-10_2.5x1.0mm_P0.5mm [mm]
  rrect50% 0.55x0.3 smd: 1(-0.385,1) 2(-0.385,0.5) 3(-0.385,0) 4(-0.385,-0.5) 5(-0.385,-1) 6(0.385,-1) 7(0.385,-0.5) 8(0.385,0) 9(0.385,0.5) 10(0.385,1)
VQFN-16-1EP_3x3mm_P0.5mm_EP1.68x1.68mm#1 [mm]
  rrect25% 0.825x0.25 smd: 1(-1.462,0.75) 2(-1.462,0.25) 3(-1.462,-0.25) 4(-1.462,-0.75) 9(1.462,-0.75) 10(1.462,-0.25) 11(1.462,0.25) 12(1.462,0.75)
  rrect25% 0.25x0.825 smd: 5(-0.75,-1.462) 6(-0.25,-1.462) 7(0.25,-1.462) 8(0.75,-1.462) 13(0.75,1.462) 14(0.25,1.462) 15(-0.25,1.462) 16(-0.75,1.462)
  rect 1.68x1.68 smd: 17(0,0)
  rrect25% 0.68x0.68 on Top Paste: Un1(-0.42,0.42) Un2(-0.42,-0.42) Un3(0.42,0.42) Un4(0.42,-0.42)
VQFN-16-1EP_3x3mm_P0.5mm_EP1.68x1.68mm#2 [mm]
  rrect50% 0.825x0.25 smd: 1(-1.462,0.75) 2(-1.462,0.25) 3(-1.462,-0.25) 4(-1.462,-0.75) 9(1.462,-0.75) 10(1.462,-0.25) 11(1.462,0.25) 12(1.462,0.75)
  rrect50% 0.25x0.825 smd: 5(-0.75,-1.462) 6(-0.25,-1.462) 7(0.25,-1.462) 8(0.75,-1.462) 13(0.75,1.462) 14(0.25,1.462) 15(-0.25,1.462) 16(-0.75,1.462)
  rect 1.68x1.68 smd: 17(0,0)
  rrect50% 0.68x0.68 on Top Paste: Un1(-0.42,0.42) Un2(-0.42,-0.42) Un3(0.42,0.42) Un4(0.42,-0.42)
VSON-8_3.3x3.3mm_P0.65mm_NexFET [mm]
  rrect25% 0.63x0.5 smd mask+0: 1(-1.44,0.97) 2(-1.44,0.33) 3(-1.44,-0.33) 4(-1.44,-0.97)
  rect 1.9x2.45 smd paste-2.45 mask+0: 5(0.385,0)
  rect 0.57x0.738 on Top Paste mask-0.738: Un1(-0.09,0.61) Un2(-0.09,-0.61) Un3(0.86,0.61) Un4(0.86,-0.61)
  rrect50% 0.63x0.5 on Top Paste mask-0.63: Un5(1.44,0.972) Un6(1.44,0.33) Un7(1.44,-0.33) Un8(1.44,-0.972)

## Part data
C1 C90: library part C, MPN=10uF_25V_X7R, hierarchy_path=/66980d89-56fb-4772-93a7-06a61d388399/6dd53468-99c2-4197-8bec-3687fb851dcd
C2: library part C, MPN=22uF_6.3V_X7R, hierarchy_path=/66980d89-56fb-4772-93a7-06a61d388399/6dd53468-99c2-4197-8bec-3687fb851dcd
C3 C7D C92: library part C, MPN=3.3nF_X7R, hierarchy_path=/66980d89-56fb-4772-93a7-06a61d388399/6dd53468-99c2-4197-8bec-3687fb851dcd
C4 C6D C93: library part C, MPN=100nF_25V_X7R, hierarchy_path=/66980d89-56fb-4772-93a7-06a61d388399/6dd53468-99c2-4197-8bec-3687fb851dcd
C6I: library part C, MPN=100nF_100V_X7R, hierarchy_path=/66980d89-56fb-4772-93a7-06a61d388399/6dd53468-99c2-4197-8bec-3687fb851dcd
C10 C11 C21: library part C, MPN=2.2uF_6.3V_X7R
  C10 C11: hierarchy_path=/66980d89-56fb-4772-93a7-06a61d388399/531916ae-7957-4d09-a2e0-18a9c70f6c21
  C21: hierarchy_path=/66980d89-56fb-4772-93a7-06a61d388399/1152ce88-d77a-4f94-b3cb-08896bab9e7a
C12: library part C, MPN=4.7uF_6.3V_X7R, hierarchy_path=/66980d89-56fb-4772-93a7-06a61d388399/531916ae-7957-4d09-a2e0-18a9c70f6c21
C13 C15 C20 C40 C100 C101 C102 C103 C104 C105 C106 C107 C108 C109 C110 C111 C112 C113 C114 C115: library part C, MPN=100nF_6.3V_X7R
  C13 C15: hierarchy_path=/66980d89-56fb-4772-93a7-06a61d388399/531916ae-7957-4d09-a2e0-18a9c70f6c21
  C20: hierarchy_path=/66980d89-56fb-4772-93a7-06a61d388399/1152ce88-d77a-4f94-b3cb-08896bab9e7a
  C40: hierarchy_path=/66980d89-56fb-4772-93a7-06a61d388399/2b812d5a-90b0-498f-afec-462f55ab5efa
  C100: Decouples_U1_Pin=15, hierarchy_path=/66980d89-56fb-4772-93a7-06a61d388399/531916ae-7957-4d09-a2e0-18a9c70f6c21
  C101: Decouples_U1_Pin=23, hierarchy_path=/66980d89-56fb-4772-93a7-06a61d388399/531916ae-7957-4d09-a2e0-18a9c70f6c21
  C102: Decouples_U1_Pin=36, hierarchy_path=/66980d89-56fb-4772-93a7-06a61d388399/531916ae-7957-4d09-a2e0-18a9c70f6c21
  C103: Decouples_U1_Pin=49, hierarchy_path=/66980d89-56fb-4772-93a7-06a61d388399/531916ae-7957-4d09-a2e0-18a9c70f6c21
  C104: Decouples_U1_Pin=62, hierarchy_path=/66980d89-56fb-4772-93a7-06a61d388399/531916ae-7957-4d09-a2e0-18a9c70f6c21
  C105: Decouples_U1_Pin=72, hierarchy_path=/66980d89-56fb-4772-93a7-06a61d388399/531916ae-7957-4d09-a2e0-18a9c70f6c21
  C106: Decouples_U1_Pin=82, hierarchy_path=/66980d89-56fb-4772-93a7-06a61d388399/531916ae-7957-4d09-a2e0-18a9c70f6c21
  C107: Decouples_U1_Pin=91, hierarchy_path=/66980d89-56fb-4772-93a7-06a61d388399/531916ae-7957-4d09-a2e0-18a9c70f6c21
  C108: Decouples_U1_Pin=103, hierarchy_path=/66980d89-56fb-4772-93a7-06a61d388399/531916ae-7957-4d09-a2e0-18a9c70f6c21
  C109: Decouples_U1_Pin=127, hierarchy_path=/66980d89-56fb-4772-93a7-06a61d388399/531916ae-7957-4d09-a2e0-18a9c70f6c21
  C110: Decouples_U1_Pin=136, hierarchy_path=/66980d89-56fb-4772-93a7-06a61d388399/531916ae-7957-4d09-a2e0-18a9c70f6c21
  C111: Decouples_U1_Pin=149, hierarchy_path=/66980d89-56fb-4772-93a7-06a61d388399/531916ae-7957-4d09-a2e0-18a9c70f6c21
  C112: Decouples_U1_Pin=159, hierarchy_path=/66980d89-56fb-4772-93a7-06a61d388399/531916ae-7957-4d09-a2e0-18a9c70f6c21
  C113: Decouples_U1_Pin=172, hierarchy_path=/66980d89-56fb-4772-93a7-06a61d388399/531916ae-7957-4d09-a2e0-18a9c70f6c21
  C114: Decouples_U1_Pin=114, hierarchy_path=/66980d89-56fb-4772-93a7-06a61d388399/531916ae-7957-4d09-a2e0-18a9c70f6c21
  C115: Filters_U1_Pin=31, hierarchy_path=/66980d89-56fb-4772-93a7-06a61d388399/531916ae-7957-4d09-a2e0-18a9c70f6c21
C14: library part C, MPN=1uF_6.3V_X7R, hierarchy_path=/66980d89-56fb-4772-93a7-06a61d388399/531916ae-7957-4d09-a2e0-18a9c70f6c21
C22: library part C, MPN=10nF_6.3V_X7R, hierarchy_path=/66980d89-56fb-4772-93a7-06a61d388399/1152ce88-d77a-4f94-b3cb-08896bab9e7a
C91: library part C, MPN=22uF_10V_X7R, hierarchy_path=/66980d89-56fb-4772-93a7-06a61d388399/6dd53468-99c2-4197-8bec-3687fb851dcd
C800 C801: library part C, MPN=C3225X7S2A475K200AB, hierarchy_path=/66980d89-56fb-4772-93a7-06a61d388399/6dd53468-99c2-4197-8bec-3687fb851dcd
C802: library part C, MPN=47nF_100V_X7R, hierarchy_path=/66980d89-56fb-4772-93a7-06a61d388399/6dd53468-99c2-4197-8bec-3687fb851dcd
C803: library part C, MPN=2.2uF_10V_X7R, hierarchy_path=/66980d89-56fb-4772-93a7-06a61d388399/6dd53468-99c2-4197-8bec-3687fb851dcd
C804: library part C, MPN=1uF_25V_X7R, hierarchy_path=/66980d89-56fb-4772-93a7-06a61d388399/6dd53468-99c2-4197-8bec-3687fb851dcd
C805: library part C, MPN=470nF_25V_X7R, hierarchy_path=/66980d89-56fb-4772-93a7-06a61d388399/6dd53468-99c2-4197-8bec-3687fb851dcd
C806 C807 C808 C809: library part C, MPN=47uF_25V_X7R, hierarchy_path=/66980d89-56fb-4772-93a7-06a61d388399/6dd53468-99c2-4197-8bec-3687fb851dcd
D1: library part D_TVS, hierarchy_path=/66980d89-56fb-4772-93a7-06a61d388399/6dd53468-99c2-4197-8bec-3687fb851dcd, MPN=SMCJ36CA
D3 D8: library part TPD4E05U06DQAR, Capture_Status=LOCAL_CONTRACT_SYMBOL, MPN=TPD4E05U06DQAR
  D3: hierarchy_path=/66980d89-56fb-4772-93a7-06a61d388399/8d70ae48-bcdc-481f-a052-a7c6b659cbf0
  D8: hierarchy_path=/66980d89-56fb-4772-93a7-06a61d388399/9c5f5607-c07c-4d34-adbd-36601c2debbf
D4: library part ESD2CANFD24DBZRQ1, Capture_Status=LOCAL_CONTRACT_SYMBOL, hierarchy_path=/66980d89-56fb-4772-93a7-06a61d388399/2b812d5a-90b0-498f-afec-462f55ab5efa, MPN=ESD2CANFD24DBZRQ1
FB1: library part L_Ferrite, hierarchy_path=/66980d89-56fb-4772-93a7-06a61d388399/531916ae-7957-4d09-a2e0-18a9c70f6c21, MPN=BLM18BD601SH1
J1 J5: library part Conn_01x02, MPN=43650-0200
  J1: hierarchy_path=/66980d89-56fb-4772-93a7-06a61d388399/6dd53468-99c2-4197-8bec-3687fb851dcd
  J5: hierarchy_path=/66980d89-56fb-4772-93a7-06a61d388399/2b812d5a-90b0-498f-afec-462f55ab5efa
J4 J6: library part Conn_01x06, MPN=43045-0600
  J4: hierarchy_path=/66980d89-56fb-4772-93a7-06a61d388399/2b812d5a-90b0-498f-afec-462f55ab5efa
  J6: hierarchy_path=/66980d89-56fb-4772-93a7-06a61d388399/8d70ae48-bcdc-481f-a052-a7c6b659cbf0
J8: library part Conn_01x06, MPN=SM06B-GHS-TB(LF)(SN), hierarchy_path=/66980d89-56fb-4772-93a7-06a61d388399/9c5f5607-c07c-4d34-adbd-36601c2debbf
J10: library part Conn_01x06, MPN=TC2030-NL_TARGET, hierarchy_path=/66980d89-56fb-4772-93a7-06a61d388399/531916ae-7957-4d09-a2e0-18a9c70f6c21
L1 L9: library part L, MPN=XFL4020-222MEC, hierarchy_path=/66980d89-56fb-4772-93a7-06a61d388399/6dd53468-99c2-4197-8bec-3687fb851dcd
L8: library part L, MPN=XAL7070-103MEC, hierarchy_path=/66980d89-56fb-4772-93a7-06a61d388399/6dd53468-99c2-4197-8bec-3687fb851dcd
R1: library part R, MPN=4.02k_1%, hierarchy_path=/66980d89-56fb-4772-93a7-06a61d388399/6dd53468-99c2-4197-8bec-3687fb851dcd
R2: library part R, MPN=1.05k_1%, hierarchy_path=/66980d89-56fb-4772-93a7-06a61d388399/6dd53468-99c2-4197-8bec-3687fb851dcd
R5P R90 R800 R802 R803 R806: library part R, MPN=100k_1%, hierarchy_path=/66980d89-56fb-4772-93a7-06a61d388399/6dd53468-99c2-4197-8bec-3687fb851dcd
R6F R7F R10 R41 R42 R600 R605: library part R, MPN=10k_1%
  R6F R7F: hierarchy_path=/66980d89-56fb-4772-93a7-06a61d388399/6dd53468-99c2-4197-8bec-3687fb851dcd
  R10: hierarchy_path=/66980d89-56fb-4772-93a7-06a61d388399/531916ae-7957-4d09-a2e0-18a9c70f6c21
  R41 R42: hierarchy_path=/66980d89-56fb-4772-93a7-06a61d388399/2b812d5a-90b0-498f-afec-462f55ab5efa
  R600 R605: hierarchy_path=/66980d89-56fb-4772-93a7-06a61d388399/8d70ae48-bcdc-481f-a052-a7c6b659cbf0
R40: library part R, MPN=120R_1%, hierarchy_path=/66980d89-56fb-4772-93a7-06a61d388399/2b812d5a-90b0-498f-afec-462f55ab5efa
R61: library part R, MPN=887k_1%, hierarchy_path=/66980d89-56fb-4772-93a7-06a61d388399/6dd53468-99c2-4197-8bec-3687fb851dcd
R62: library part R, MPN=29.4k_1%, hierarchy_path=/66980d89-56fb-4772-93a7-06a61d388399/6dd53468-99c2-4197-8bec-3687fb851dcd
R63: library part R, MPN=34.0k_1%, hierarchy_path=/66980d89-56fb-4772-93a7-06a61d388399/6dd53468-99c2-4197-8bec-3687fb851dcd
R70: library part R, hierarchy_path=/66980d89-56fb-4772-93a7-06a61d388399/3686b07d-3d02-4fcb-be66-106e5ebdc9c7, MPN=0R
R71: library part R, MPN=470k_1%, hierarchy_path=/66980d89-56fb-4772-93a7-06a61d388399/6dd53468-99c2-4197-8bec-3687fb851dcd
R72: library part R, MPN=16.9k_1%, hierarchy_path=/66980d89-56fb-4772-93a7-06a61d388399/6dd53468-99c2-4197-8bec-3687fb851dcd
R73: library part R, MPN=43.7k_1%, hierarchy_path=/66980d89-56fb-4772-93a7-06a61d388399/6dd53468-99c2-4197-8bec-3687fb851dcd
R601 R602 R603 R604: library part R, MPN=33R_1%, hierarchy_path=/66980d89-56fb-4772-93a7-06a61d388399/8d70ae48-bcdc-481f-a052-a7c6b659cbf0
R801: library part R, MPN=9.09k_1%, hierarchy_path=/66980d89-56fb-4772-93a7-06a61d388399/6dd53468-99c2-4197-8bec-3687fb851dcd
R804: library part R, MPN=499k_1%, hierarchy_path=/66980d89-56fb-4772-93a7-06a61d388399/6dd53468-99c2-4197-8bec-3687fb851dcd
R805: library part R, MPN=56.0k_1%, hierarchy_path=/66980d89-56fb-4772-93a7-06a61d388399/6dd53468-99c2-4197-8bec-3687fb851dcd
SW1: library part SW_Push, MPN=TL3301NF160QG, hierarchy_path=/66980d89-56fb-4772-93a7-06a61d388399/3686b07d-3d02-4fcb-be66-106e5ebdc9c7
TP1 TP2: library part TestPoint, hierarchy_path=/66980d89-56fb-4772-93a7-06a61d388399/531916ae-7957-4d09-a2e0-18a9c70f6c21
  TP1: MPN=HOST_UART1_TX
  TP2: MPN=HOST_UART1_RX
U1: library part STM32H753IITx, hierarchy_path=/66980d89-56fb-4772-93a7-06a61d388399/531916ae-7957-4d09-a2e0-18a9c70f6c21, MPN=STM32H753IIT6
U2: library part ICM-42688-P, Capture_Status=LOCAL_CONTRACT_SYMBOL, hierarchy_path=/66980d89-56fb-4772-93a7-06a61d388399/1152ce88-d77a-4f94-b3cb-08896bab9e7a, MPN=ICM-42688-P
U4: library part TCAN3404DRBRQ1, Capture_Status=LOCAL_CONTRACT_SYMBOL, hierarchy_path=/66980d89-56fb-4772-93a7-06a61d388399/2b812d5a-90b0-498f-afec-462f55ab5efa, MPN=TCAN3404DRBRQ1
U5: library part TPS62132RGTR, Capture_Status=LOCAL_CONTRACT_SYMBOL, hierarchy_path=/66980d89-56fb-4772-93a7-06a61d388399/6dd53468-99c2-4197-8bec-3687fb851dcd, MPN=TPS62132RGTR
U6: library part TPS26630RGER, Capture_Status=LOCAL_CONTRACT_SYMBOL, hierarchy_path=/66980d89-56fb-4772-93a7-06a61d388399/6dd53468-99c2-4197-8bec-3687fb851dcd, MPN=TPS26630RGER
U7: library part TPS259470ARPWR, Capture_Status=LOCAL_CONTRACT_SYMBOL, hierarchy_path=/66980d89-56fb-4772-93a7-06a61d388399/6dd53468-99c2-4197-8bec-3687fb851dcd, MPN=TPS259470ARPWR
U8: library part LM76005RNPR, Capture_Status=LOCAL_CONTRACT_SYMBOL, hierarchy_path=/66980d89-56fb-4772-93a7-06a61d388399/6dd53468-99c2-4197-8bec-3687fb851dcd, MPN=LM76005RNPR
U9: library part TPS62133RGTR, Capture_Status=LOCAL_CONTRACT_SYMBOL, hierarchy_path=/66980d89-56fb-4772-93a7-06a61d388399/6dd53468-99c2-4197-8bec-3687fb851dcd, MPN=TPS62133RGTR
Y1: library part ECS-2520S33-250-FN-TR, Capture_Status=LOCAL_CONTRACT_SYMBOL, hierarchy_path=/66980d89-56fb-4772-93a7-06a61d388399/531916ae-7957-4d09-a2e0-18a9c70f6c21, MPN=ECS-2520S33-250-FN-TR
Q6: hierarchy_path=/66980d89-56fb-4772-93a7-06a61d388399/6dd53468-99c2-4197-8bec-3687fb851dcd, MPN=CSD19537Q3
Q7: hierarchy_path=/66980d89-56fb-4772-93a7-06a61d388399/6dd53468-99c2-4197-8bec-3687fb851dcd, MPN=BSS138

## Free pads (board coordinates)
  rrect25% 24.41x22.05 smd: 1(1476.38,1644.49)
  rrect50% 31.5x37.4 smd: 1(2644.69,354.33) 2(2709.65,354.33) 2(3103.35,1417.32)
  rrect50% 37.4x31.5 smd: 1(2696.85,125)
  rrect50% 25.2x19.68 smd: 1(2960.63,2164.96) 2(2960.63,2205.12)
  rrect25% 31.5x37.4 smd: 1(3038.39,1417.32)
  rrect50% 24.41x22.05 smd: 2(1476.38,1682.28)
  rrect25% 37.4x31.5 smd: 2(2696.85,189.96)
  round 125.98 hole 125.98 unplated: H1(196.85,196.85) H2(3346.46,196.85) H3(196.85,2559.06) H4(3346.46,2559.06)

## Via types
v1: diameter 15.75, hole 7.87, Top Layer to Bottom Layer, 102 vias
v2: diameter 23.62, hole 11.81, Top Layer to Bottom Layer, 91 vias
v3: diameter 19.68, hole 9.84, Top Layer to Bottom Layer, 22 vias
v4: diameter 15.75, hole 7.87, Top Layer to Bottom Layer, tented both sides, 17 vias
v5: diameter 19.68, hole 7.87, Top Layer to Bottom Layer, 15 vias
v6: diameter 15.75, hole 7.87, Top Layer to Mid-Layer 1, 3 vias
v7: diameter 19.68, hole 7.87, Top Layer to Bottom Layer, tented both sides, 3 vias
v8: diameter 23.62, hole 11.81, Top Layer to Bottom Layer, tented both sides, 2 vias
v9: diameter 19.68, hole 9.84, Top Layer to Bottom Layer, tented both sides, 1 vias

## Nets (pads, with @x,y where several pads share a name; then routed paths per layer and width w, separated by ;. In a path a pad name is that pad's centre, name@x,y a point inside that pad or via, vN(x,y) a via of type N, cw(c..) or ccw(c..) an arc to the next point about the centre after c; other vN are vias at no path point)
3V3: C2.1 C12.1 C15.1 C20.1 C21.1 C22.1 C40.1 C100.1 C102.1 C103.1 C104.1 C105.1 C106.1 C107.1 C108.1 C109.1 C110.1 C111.1 C112.1 C113.1 C114.1 FB1.1 J10.1 L1.2 pad.1@1476.38,1644.49 pad.2@2696.85,189.96 R5P.2 R6F.2 R7F.2 R600.1 R605.1 R803.2 U1.6 U1.15 U1.23 U1.36 U1.49 U1.62 U1.72 U1.82 U1.91 U1.103 U1.114 U1.127 U1.136 U1.149 U1.159 U1.171 U1.172 U2.5 U2.8 U4.3 U5.14 Y1.4 | length 4669.1
  Top Layer w5.91: v1(984.25,842.52) R6F.2@984.25,859.25 ; R803.2@1299.21,918.31 v1(1299.21,937.01) ; v1(1358.27,1341.34) C102.1@1358.27,1359.06 1362.2,1330.71 ; v2(1433.07,1314.96) U1.36@1548.23,1309.06 ; Y1.4@1445.87,1611.22 v1(1456.8,1625.16) ; v1(1476.38,1616.93) pad.1@1476.38,1644.49 ; C100.1@1476.38,1752.76 v1(1476.38,1735.04) 1491.16,1723.92 U1.15@1548.23,1722.44 ; v1(1491.22,1902.65) U1.6@1548.23,1899.61 ; v4(1506.9,1564.15) U1.23@1548.23,1564.96 ; R5P.2@1535.43,918.31 v1(1535.43,937.01) ; v1(1679.97,1123.81) 1702.76,1123.81 U1.49@1702.76,1075.79 ; v1(1692.91,967.32) C103.1@1692.91,985.04 ; U1.172@1702.76,2073.82 v1(1712.07,2105.63) U1.171@1722.44,2073.82 ; 1889.76,2126.77 C113.1@1850.39,2126.77 v2(1889.76,2149.61) ; v1(1929.13,967.32) C104.1@1929.13,985.04 ; v1(1929.13,2384.65) C20.1@1929.13,2402.36 ; U1.62@1958.66,1075.79 v1(1962.56,1030.68) ; U1.159@1958.66,2073.82 1958.66,2165.35 ; v1(1992.13,964.57) C12.1@2009.84,964.57 ; J10.1@1993.5,146.85 v1(2001.43,131) ; v1(1999.02,2440.95) C21.1@2016.73,2440.94 ; U2.5@2027.56,2333.17 2031.5,2314.96 2039.37,2307.09 v1(2062.99,2307.09) ; U2.8@2087.11,2312.99 v4(2094.16,2329.24) ; v1(2145.08,1123.88) 2155.51,1123.88 U1.72@2155.51,1075.79 ; U1.149@2155.51,2073.82 2157.48,2086.61 2157.48,2110.24 2165.35,2118.11 2165.35,2125.98 v1(2196.85,2157.48) 2181.1,2141.73 C112.1@2165.35,2126.77 ; v1(2165.35,967.32) C105.1@2165.35,985.04 ; v1(2165.35,2384.65) C22.1@2165.35,2402.36 ; U1.82@2352.36,1075.79 v1(2356.3,999.04) ; v1(2401.57,967.32) C106.1@2401.57,985.04 ; U1.136@2411.42,2073.82 v2(2411.42,2165.35) ; v1(2430.64,1317.37) 2430.64,1427.16 U1.103@2546.26,1427.17 ; v8(2519.68,2094.49) C111.1@2519.69,2126.77 v4(2519.68,2116.14) ; U1.91@2546.26,1190.94 2661.42,1190.94 ; U1.114@2546.26,1643.7 2591.11,1643.7 2591.11,1649.89 v1(2607.28,1655.26) C109.1@2618.11,1674.02 ; U1.127@2546.26,1899.61 v4(2587.54,1901.81) ; v1(2566.93,846.46) L1.2@2586.02,846.46 ; v1(2588.58,249.02) pad.2@2696.85,189.96 ; v1(2608.27,1595.28) C114.1@2657.48,1595.28 ; v1(2675.89,1094.67) U4.3@2740.16,1128.94 ; v1(2716.53,1526.08) FB1.1@2716.54,1543.8 ; v1(2736.22,1203.54) 2736.22,1221.26 v2(2795.28,1250) ; v1(2834.64,1957.68) R605.1@2834.65,1975.39 ; v1(2834.65,2075.79) R600.1@2834.65,2093.5 ; v1(3031.5,963.39) C40.1@3031.5,981.1
  Top Layer w11.81: 1362.2,1330.71 v2(1385.83,1307.09) ; v1(1456.8,1625.16) v1(1476.38,1616.93) ; 1889.76,2126.77 v2(1889.76,2149.61) ; v2(1921.26,2165.35) 1958.66,2165.35 ; U5.14@2076.77,493.6 2076.77,440.94 2133.86,383.86 2235.24,383.86 C2.1@2263.78,355.31 2303.15,315.94 2452.76,315.94 pad.2@2696.85,189.96 ; v2(2661.42,1157.48) 2661.42,1190.94 ; C110.1@2677.17,1870.08 2755.91,1929.13 R605.1@2834.65,1975.39
  Mid-Layer 1 w11.81: v1(1929.13,2384.65) v1(1999.02,2440.95) ; v1(2196.85,2157.48) 2228.35,2204.72 2228.35,2244.09 2411.42,2244.09 v2(2411.42,2165.35)
  Mid-Layer 2 w5.91: v1(2356.3,999.04) 2366.14,999.04 2397.64,967.52 v1(2401.57,967.32) ; 2732.28,1102.36 2736.22,1112.2 2736.22,1190.94 v2(2795.28,1250)
  Mid-Layer 2 w11.81: v2(1385.83,1307.09) 1385.83,1338.58 1433.07,1338.58 v2(1433.07,1314.96) ; v2(2411.42,2165.35) 2411.42,2062.99 2551.18,2062.99 v8(2519.68,2094.49) ; v2(2661.42,1157.48) 2661.42,1102.36 2732.28,1102.36
  Bottom Layer w11.81: v2(1889.76,2149.61) v2(1921.26,2165.35)
  other v1: 2618.11,1359.06 1692.91,2126.77
  other v2: 984.25,748.03 1456.69,748.03 2559.06,748.03
5V_GNSS: C91.1 J8.1 L9.2 R90.2 U9.14 | length 1757.3
  Top Layer w9.84: U9.14@797.24,2301.67 v5(797.24,2381.89)
  Top Layer w19.68: J8.1@124.02,2121.06 124.02,1948.82 748.03,1948.82 v5(826.77,2018.7) ; v5(964.57,2178.15) 984.25,2145.67 1149.02,2145.67 L9.2@1149.02,2244.09
  Mid-Layer 2 w19.68: v5(797.24,2381.89) v5(964.57,2178.15)
  Bottom Layer w19.68: v5(826.77,2018.7) v5(964.57,2178.15)
BOOT0: pad.1@2696.85,125 R10.1 U1.166 | length 3500
  Top Layer w5.91: v3(2519.68,153.54) 2500,133.86 2480.32,114.17 2480.32,39.37 2500,19.68 2677.17,19.68 pad.1@2696.85,133.86
  Top Layer w7.87: v2(1771.65,2125.98) 1779.53,2118.11 1811.02,2118.11 ; U1.166@1820.87,2073.82 1818.9,2118.11 1803.15,2118.11 1811.02,2118.11 ; 1811.02,2118.11 R10.1@1811.02,2152.56 1811.02,2118.11
  Mid-Layer 1 w5.91: v2(1771.65,2125.98) 1771.65,2145.67 1889.76,2263.78 2421.26,2263.78 2484.25,2200.79 2484.25,2094.49 2519.68,2059.06 v3(2519.68,153.54)
BUCK5_SW: L9.1 U9.1 U9.2 U9.3 | length 825.9
  Top Layer w9.84: 716.54,2291.34 U9.1@729.82,2273.62 U9.3@729.82,2234.25
  Top Layer w31.5: 716.54,2291.34 716.54,2480.32 1055.71,2480.32 L9.1@1055.71,2244.09
BUCK_SW: L1.1 U5.1 U5.2 U5.3 | length 555.8
  Top Layer w5.91: U5.1@2144.19,521.65 U5.2@2144.19,541.34 U5.3@2144.19,561.02 2153.54,555.12
  Top Layer w15.75: 2153.54,555.12 2279.53,555.12 2492.13,767.72 L1.1@2492.72,846.46
CAN_RX: U1.142 U4.4 | length 3161.2
  Top Layer w7.87: U1.142@2293.31,2073.82 v2(2293.31,2165.35) ; v2(2696.85,1072.83) U4.4@2740.16,1103.35
  Mid-Layer 2 w7.87: v2(2293.31,2165.35) 2303.15,2175.2 2618.11,2490.16 2618.11,2568.9 2598.43,2588.58 2027.56,2588.58 1978.35,2539.37 1978.35,1850.39 2588.58,1240.16 2588.58,1102.36 2618.11,1072.83 2687.01,1072.83 v2(2696.85,1072.83)
CAN_TX: U1.143 U4.1 | length 1292.2
  Top Layer w5.91: v2(2696.85,1161.42) 2716.54,1180.12 U4.1@2740.16,1180.12
  Top Layer w7.87: v2(2273.62,2017.72) U1.143@2273.62,2073.82
  Bottom Layer w7.87: v2(2273.62,2017.72) 2283.46,2007.87 2411.42,1879.92 2618.11,1879.92 2627.95,1870.08 2627.95,1496.06 2588.58,1456.69 2588.58,1269.68 2687.01,1171.26 v2(2696.85,1161.42)